# Altium PCB Acoustics Board.PcbDoc (part 2 of 3)
Units mil, origin at the board's own origin, x right, y up, seen from the top; angles counter-clockwise.
Board outline 4100 x 5000 mil, 4 copper layers (Top Layer, Middle 1 Layer, Middle 2 Layer, Bottom Layer), stack 53.912 mil thick; 240 components, 165 nets, 793 pads, 573 vias.
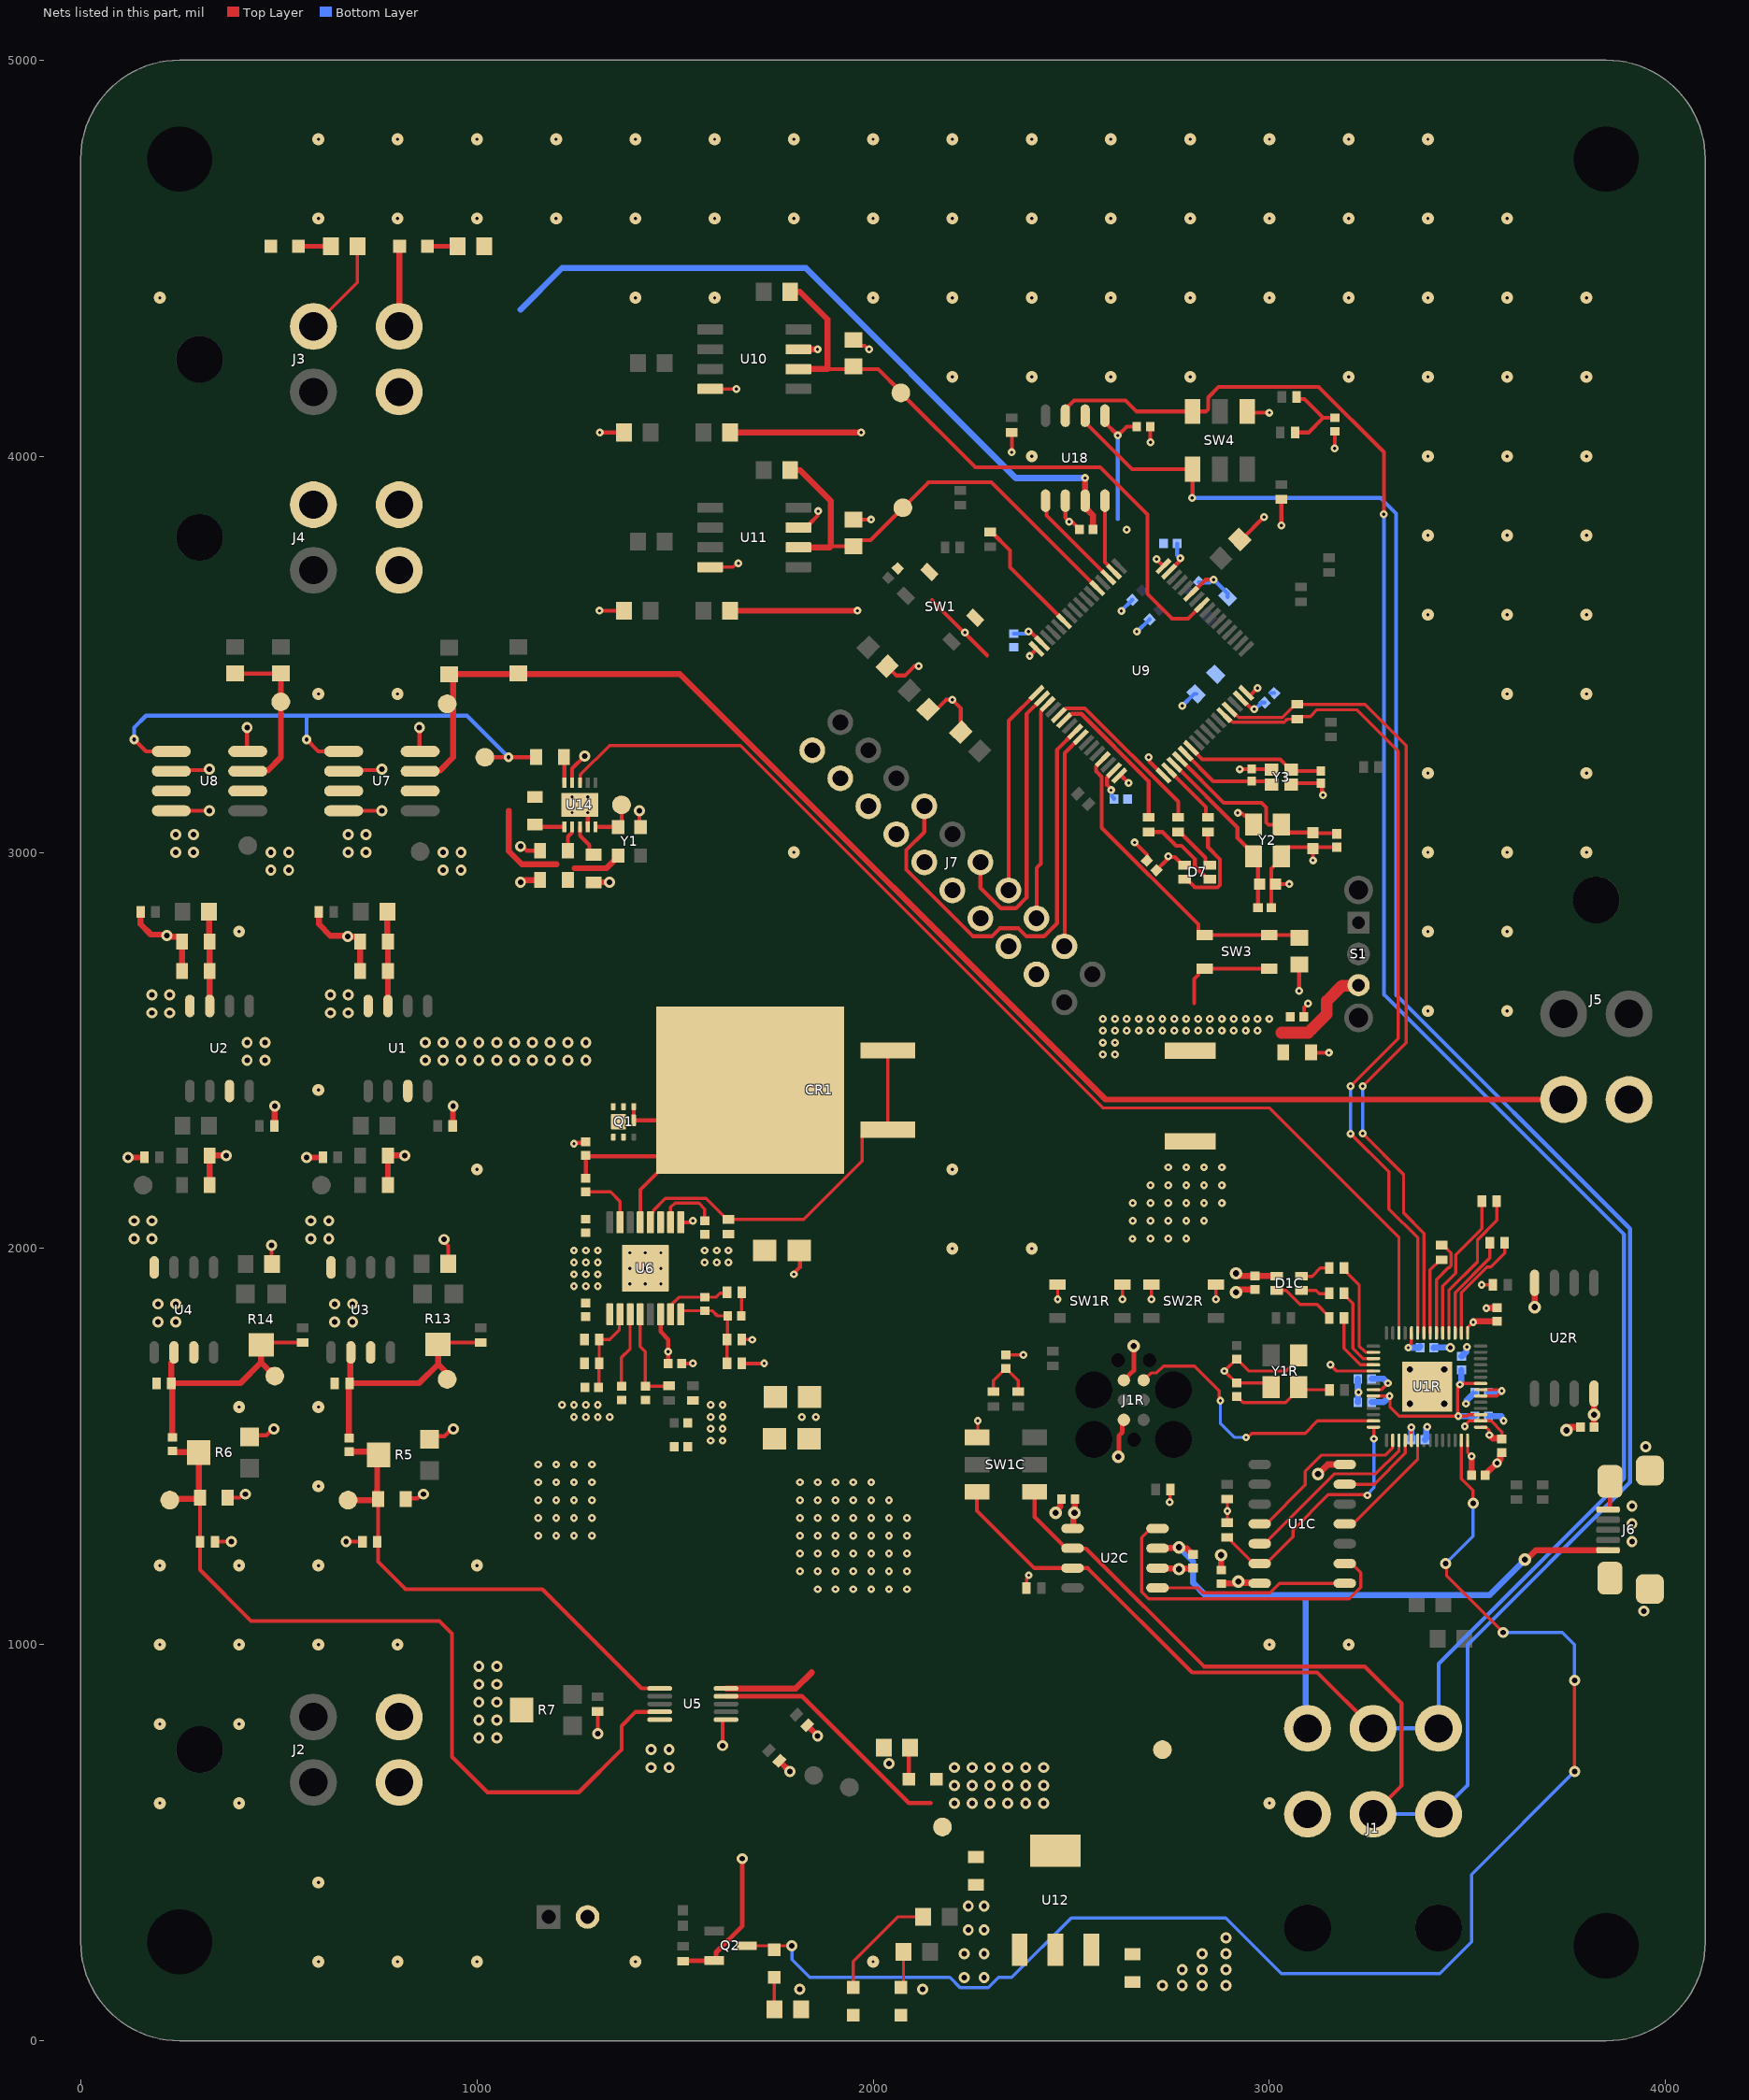
[diagram p4: the nets of this part, all layers, seen from the top]

## Part data (continued)
R17: library part RESISTOR_1K_0402, "RES 1k OHM 1% 1/16W 0402", Digikey Part Numer=CR0603-JW-104ELFTR-ND, Supplier Part Number 1=541-1.00MLCT-ND, Tolerance="+/- 1%", Value  (Ohms)=1M, Made By="Robert Pafford", Supplier=Digikey, Supplier 1=Digikey, Wattage=1/16W
R18: library part RESISTOR_1K_0402, "RES 1k OHM 1% 1/16W 0402", Digikey Part Numer=CR0603-JW-104ELFTR-ND, Supplier Part Number 1=P19181CT-ND, Tolerance="+/- 1%", Value  (Ohms)=10m, Made By="Robert Pafford", Supplier=Digikey, Supplier 1=Digikey, Wattage=1/16W
R19: library part RESISTOR_1K_0402, "RES 1k OHM 1% 1/16W 0402", Digikey Part Numer=CR0603-JW-104ELFTR-ND, Supplier Part Number 1=P5.23KLCT-ND, Tolerance="+/- 1%", Value  (Ohms)=5.23K, Made By="Robert Pafford", Supplier=Digikey, Supplier 1=Digikey, Wattage=1/16W
R21: library part RESISTOR_1K_0402, "RES 1k OHM 1% 1/16W 0402", Digikey Part Numer=CR0603-JW-104ELFTR-ND, Supplier Part Number 1=P21.5KLCT-ND, Tolerance="+/- 1%", Value  (Ohms)=21.5K, Made By="Robert Pafford", Supplier=Digikey, Supplier 1=Digikey, Wattage=1/16W
R22: library part RESISTOR_1K_0402, "RES 1k OHM 1% 1/16W 0402", Digikey Part Numer=CR0603-JW-104ELFTR-ND, Supplier Part Number 1=541-1.65KLCT-ND, Tolerance="+/- 1%", Value  (Ohms)=1.65K, Made By="Robert Pafford", Supplier=Digikey, Supplier 1=Digikey, Wattage=1/16W
R24 R25 R28 R29: library part RESISTOR_100K_0603, "RES 100k OHM 5% 1/10W 0603", Digikey Part Numer=CR0603-JW-104ELFTR-ND, Supplier Part Number 1=CR0603-JW-104ELFCT-ND, Tolerance="+/- 5%", Value  (Ohms)=100K, ComponentLink1Description=Datasheet, ComponentLink1URL=https://www.bourns.com/docs/product-datasheets/CRxxxxx.pdf, Made By="Flip B", Supplier=Digikey, Supplier 1=Digi-Key, Wattage=1/10W
R30: library part CMP-1018-00001-1, "Jumper 2512 (6432 Metric)", Case-EIA=2512, Case-Metric=6432, Power=None, Technology=SMT, Tolerance=None
R32: library part CMP-2002-00501-1, "RES SMD 27K OHM 5% 1/10W 0402ERJ-2GEJ273X", Manufacturer=Panasonic, Part Number=ERJ-2GEJ273X
R33 R34 R35 R36 R37 R50: library part RESISTOR_4.7K_0603, "RES 4.7k OHM 5% 1/10W 0603", Digikey Part Numer=CR0603-JW-104ELFTR-ND, Supplier Part Number 1=RMCF0603JT4K70CT-ND, Tolerance="+/- 5%", Value  (Ohms)=4.7K, Made By="Robert Pafford", Supplier=Digikey, Supplier 1=Digi-Key, Wattage=1/10W
R48 R49: library part RESISTOR_27_0603, "RES 27 OHM 5% 1/8W 0603", Digikey Part Numer=CR0603-JW-104ELFTR-ND, Supplier Part Number 1=2019-RK73B1JTTD270JCT-ND, Tolerance="+/- 5%", Value  (Ohms)=27, ComponentLink1Description=Datasheet, ComponentLink1URL=https://www.bourns.com/docs/product-datasheets/CRxxxxx.pdf, Made By="Robert Pafford", Supplier=Digikey, Supplier 1=Digi-Key, Wattage=1/8W
S1: "SWITCH SLIDE SPDT 300MA 30V", Supplier Part Number 1=CKN10397-ND, Supplier 1=Digikey
SB1 SB2 SB3 SB4 SB5 SB6 SB7: library part JUMPER_0_0603, "0 Ohm Jumper No Fit for Solder Bridge", Value  (Ohms)=0, ComponentLink1Description=Digikey, ComponentLink1URL=https://www.digikey.com/en/products/detail/koa-speer-electronics-inc/RK73B1JTTD101J/9844701, Made By="Robert Pafford"
SW1 SW3: library part "Tactile Switch SMD", "WS-TASV J-Bend SMT Tact Switch, SPST-NO, 16VDC, 50mA, 260g", Manufacturer="Wurth Elektronik", Operating Temperature Max=85°C, Operating Temperature Min=-40°C, Rated Current=50mA, Rated Voltage=16VDC, Supplier Part Number 1=710-434123025826, Category="Tact Switches", Circuit=SPST-NO, ComponentLink1Description="Website Link", ComponentLink1URL=https://www.we-online.com/redexpert/article/434123025826?ad, ComponentLink2Description="Datasheet Link", ComponentLink2URL=https://www.we-online.com/redexpert/spec/434123025826?ad, Contact Material="Stainless Steel", Contact Plating=Silver, Height=2.5mm, Length=4.2mm, Manufacturer Part Number=434123025826, Match Code=WS-TASV, Mount="Surface Mount", Operation Force=260g, Packaging="Tape and Reel", Supplier 1=Mouser, Terminal Material="Copper Alloy", Terminal Plating=Silver, Washable=No, Width=3.2mm
SW1C SW4: library part CAS-220TA_CAN_TERM, "GOLD SWITCH FLUSH SLIDE DPDT 100MA 6V", Current Rating="100 mA", Supplier Part Number 1=CAS220JCT-ND, Voltage Rating=6VDC, Contact Finish=Gold, Made By="Robert Pafford", Supplier 1=Digi-Key, Switch Function=DPDT
SW1R SW2R: library part "Tactile Switch SMD", "WS-TASV J-Bend SMT Tact Switch, SPST-NO, 16VDC, 50mA, 260g", Manufacturer="Wurth Elektronik", Operating Temperature Max=85°C, Operating Temperature Min=-40°C, Rated Current=50mA, Rated Voltage=16VDC, Category="Tact Switches", Circuit=SPST-NO, ComponentLink1Description="Website Link", ComponentLink1URL=https://www.we-online.com/redexpert/article/434123025826?ad, ComponentLink2Description="Datasheet Link", ComponentLink2URL=https://www.we-online.com/redexpert/spec/434123025826?ad, Contact Material="Stainless Steel", Contact Plating=Silver, Height=2.5mm, Length=4.2mm, Manufacturer Part Number=434123025826, Match Code=WS-TASV, Mount="Surface Mount", Operation Force=260g, Packaging="Tape and Reel", Terminal Material="Copper Alloy", Terminal Plating=Silver, Washable=No, Width=3.2mm
U1 U2 U3 U4: library part LM356MX/NOPB, "IC OPAMP JFET 1 CIRCUIT 8SOIC", Manufacturer="Texas Instruments", PartNumber=LM8261M5X/NOPB, Supply Current="1.3 mA", Supply Voltage="2.5 V ~ 30 V, +/- 1.25 V ~ 15 V", ComponentLink1Description=Digi-Key, ComponentLink1URL=https://www.digikey.com/en/products/detail/texas-instruments/LF356MX-NOPB/366701, Created By="Dylan T", Gain Bandwidth Product="21 MHz"
U1C: "CANbus Controller CAN 2.0 SPI Interface 14-SOIC", Made By="Robert Pafford", Max FD Rate="8 Mbps"
U1R: "Raspberry Pi RP2040", Crystal Frequency="12 MHz", Input Voltage=3.3V, Available Busses="SPI, I2C, PWM, USB", ComponentLink1Description=DigiKey, ComponentLink2Description=Datasheet, ComponentLink2URL=https://datasheets.raspberrypi.org/rp2040/rp2040-datasheet.pdf, Made By="Robert Pafford", Number of GPIOs=29
U2C U18: library part TJA1442AT, "CAN Interface IC High-Speed CAN Transceiver with Standby Mode", Supplier Part Number 1=771-TJA1442AT/0Z, Made By="Robert Pafford", Max Data Rate=5Mbps, Supplier 1=Mouser
U2R: "IC FLASH 128MBIT SPI/QUAD 8SOIC", Supplier Part Number 1=W25Q128JVSIQ-ND, Made By="Robert Pafford", Size=128M, Supplier 1=Digi-Key
U5: library part CMP-0360-00164-2, "4 ns, 150 MHz Comparator with Independent Input / Output Supplies, 2 Channels, 2.7 to 12 V, 0 to +70 degC, 10-pin MSOP (MS10)", Generic Part Number=LT1715, Manufacturer="Linear Technology", Supply Current (uA) Typical=7500, Supply Voltage Range="2.7 to 12 V", Channels (#)=2, ComponentLink1Description="Manufacturer URL", ComponentLink1URL=http://www.linear.com/, ComponentLink2Description=Datasheet, ComponentLink2URL=http://cds.linear.com/docs/en/datasheet/1715fa.pdf, ComponentLink3Description="Package Specification", ComponentLink3URL=http://cds.linear.com/docs/en/packaging/MSOP_10_05-08-1661.pdf, DatasheetVersion="Rev A", Features="Comparator, Separate In/Out Power Supply", Mounting Technology="Surface Mount", PackageDescription="10-Pin MSOP, Body 3 x 3 mm, Pitch 0.5 mm", PackageReference=MS10, PartNumber=LT1715CMS#PBF, Prop Delay (us)=0.004, RoHS=Y, Vos (mV) Guaranteed=2.5, Vos (mV) Typical=0.4, Vs Max (V)=12, Vs Min (V)=2.7
U6: library part CMP-0063-01290-3, "Wide Input Range Non-Synchronous Buck Controller, 16-pin TSSOP-EP, Pb-Free", Manufacturer="Texas Instruments", PackageTopMarking=NSUZXYTT*L25088*MH-1, PowerWise=Y, Code_JEDEC=MO-153-ABT, ComponentLink1Description="Datasheet URL", ComponentLink1URL=http://www.ti.com/general/docs/lit/getliterature.tsp?genericPartNumber=LM25088&fileType=pdf, CompType=MiscPower, PackageDescription="Molded TSSOP, Jedec, Exposed Pad, 5.0 x 4.4 x 0.9mm Body,16 Lead, 0.65mm Pitch", PackageReference=PWP0016A, PinCount=16, RoHS=Y
U7 U8: library part CMP-1592-00007-1, "Low Cost Analog Multiplier, 20 V/us, 6 mA, 0 to 70 degC, 8-Pin SOIC (R), RoHS, Tube", PartNumber=AD633, Supply Current Max="6 mA", Temperature Max="70 degC", Temperature Min="0 degC", Code_JEDEC=MS-012-AA, ComponentLink1Description="Manufacturer URL", ComponentLink1URL=http://www.analog.com/en/index.html, ComponentLink2Description=Datasheet, ComponentLink2URL=http://www.analog.com/media/en/technical-documentation/data-sheets/AD633.pdf, ComponentLink3Description="Package Specification", ComponentLink3URL=http://www.analog.com/media/en/package-pcb-resources/package/pkg_pdf/soic_narrow-r/r_8.pdf, DatasheetVersion="Rev. K", Mounting Technology="Surface Mount", Number of Channels=2, PackageDescription="8-Pin Small Outline Package, Body 4.9 x 3.9 mm, Pitch 1.27 mm", PackageVersion=06/2006, Packing=Tube, RoHS=TRUE, Slew Rate="20 V/us"
U9: "No Description Available", Mfr_Name=STMicroelectronics, RefDes=RefDes, Type=Type
U10 U11: library part CMP-0272-00518-3, "High Precision, Low Noise Operational Amplifier, 5 to 36 V, -55 to 125 degC, 8-pin SOIC (D8), Green (RoHS & no Sb/Br)", Manufacturer="Texas Instruments", Rating=Catalog, Total Supply Voltage(Max)(+5V is 5, +/-5V is 10)=36, Total Supply Voltage(Min)(+5V is 5, +/-5V is 10)=5, CMRR(Min)(dB)=120, Code_JEDEC=MS-012, ComponentLink1Description="Manufacturer URL", ComponentLink1URL=http://www.ti.com/, ComponentLink2Description=Datasheet, ComponentLink2URL=http://www.ti.com/lit/ds/symlink/opa228.pdf, ComponentLink3Description="Package Specification", ComponentLink3URL=http://www.ti.com/litv/pdf/msoi002j, DatasheetVersion=SBOS110A, Eco-Plan="Green (RoHS & no Sb/Br)", GBW(Typ)(MHz)=33, IIB(Max)(pA)=10000, Iq per channel(Max)(mA)=3.8, Mounting Technology="Surface Mount", Number of Channels=1, Offset Drift(Typ)(uV/C)=0.1, PackageDescription="8-Pin Plastic Small Outline, Body 4.9 x 3.9 mm, Pitch 1.27 mm", PackageReference=D0008A, PackageVersion="4040047-3/M, 06/2011", Packing=TUBE, PartNumber=OPA228U, Slew Rate(Typ)(V/us)=11, Sub Family="High Supply Voltage Amplifier (>=30V), Low Noise Amp (<=10nV/rtHz), Low Offset Voltage Amplifier (<=500uV), Precision Amplifier", Vio (25C)(Max)(mV)=0.075
U12: "800-mA 15-V linear voltage regulator 4-SOT-223 -40 to 125", Package="SOT-223-4 Texas Instruments", Arrow_Electronics-Purchase-URL=https://snapeda.com/shop?store=Arrow+Electronics&id=410186, Availability=Good, DigiKey-Purchase-URL=https://snapeda.com/shop?store=DigiKey&id=410186, MF="Texas Instruments", Mouser-Purchase-URL=https://snapeda.com/shop?store=Mouser&id=410186, MP=LM1117IMPX-3.3/NOPB, Price=None, SnapEDA_Link=https://www.snapeda.com/parts/LM1117IMPX-3.3/NOPB/Texas%20Instruments/view-part/410186/?ref=snap, Texas_Instruments-Purchase-URL=https://snapeda.com/shop?store=Texas+Instruments&id=410186
U14: library part AD9837ACPZ, "Direct Digital Synthesis IC 10 b 5 MHz 28 b Tuning 10-LFCSP-WD (3x3)"
Y1: library part CMP-40224-000034-1, "XTAL OSC TCXO 25.0000MHZ HCMOS", RoHS Compliant=Yes
Y1R: library part CRYSTAL_12MHz_SMD_SMALL, "12 MHz ±20ppm Crystal 18pF 100 Ohms 4-SMD, No Lead (3.2x2.5mm)", Frequency="12 MHz", Load Capacitance=18pF, Supplier Part Number 1=2151-RH100-12.000-18-2030-EXT-TRCT-ND, ESR="100 Ohms", Made By="Robert Pafford", Supplier 1=Digi-Key
Y2: library part CRYSTAL_32.786kHz_SMD_SMALL, "32.768 kHz XO (Standard) CMOS Oscillator 1.62V ~ 3.63V Enable/Disable 4-SMD, No Lead", Capacitance="15 pF"
Y3: library part CMP-27762-000556-1, "Crystal 24MHz ±10ppm 7pF SMD-4 2mm x 1.6mm", RoHS Compliant=Yes

## Free pads (board coordinates)
  round 0 hole 165 unplated: 1(250,250) 1(250,4750) 1(3850,240) 1(3850,4750)

## Via types
v1: diameter 19.68, hole 7.87, Top Layer to Bottom Layer, tented both sides, 176 vias
v2: diameter 28, hole 14, Top Layer to Bottom Layer, tented both sides, 168 vias
v3: diameter 30, hole 8, Top Layer to Bottom Layer, tented both sides, 106 vias
v4: diameter 20, hole 7.87, Top Layer to Bottom Layer, tented both sides, 99 vias
v5: diameter 31.5, hole 15.75, Top Layer to Bottom Layer, tented both sides, 19 vias
v6: diameter 24, hole 10, Top Layer to Bottom Layer, tented both sides, 3 vias
v7: diameter 23.62, hole 11.81, Top Layer to Bottom Layer, tented both sides, 2 vias

## Nets (pads, with @x,y where several pads share a name; then routed paths per layer and width w, separated by ;. In a path a pad name is that pad's centre, name@x,y a point inside that pad or via, vN(x,y) a via of type N, cw(c..) or ccw(c..) an arc to the next point about the centre after c; other vN are vias at no path point)
1v1_RP2040: C11R.1 C12R.1 C13R.1 U1R.23 U1R.45 U1R.50 | length 579.4
  Top Layer w7.87: U1R.23@3262.5,1627.83 v1(3303.35,1627.83) 3304.49,1626.69 3304.49,1599.14 3326.97,1576.65 v1(3476.57,1576.65) ; U1R.45@3533.17,1580.59 3502.17,1580.59 3498.23,1576.65 v1(3476.57,1576.65) ; U1R.50@3533.17,1659.33 3486.4,1659.33 3483.71,1656.64 v1(3480.51,1656.64) 3480.51,1653.44 3474.61,1647.53 3474.61,1578.62 v1(3476.57,1576.65)
  Bottom Layer w15.75: C12R.1@3257.48,1612.09 3287.6,1612.09 v1(3303.35,1627.83) ; v1(3476.57,1576.65) C11R.1@3518.5,1576.65 ; v1(3480.51,1656.64) 3480.51,1657.7 3484.45,1661.64 C13R.1@3484.45,1693.39
3V3: C1C.1 C3C.1 C3R.1 C4R.1 C5C.1 C5R.1 C6R.1 C7R.1 C8R.1 C9R.1 C10R.1 C29.2 C31.1 C32.1 C37.1 D1C.4 D8.1 J1R.2 Q2.2 R1C.1 R4C.1 R4R.1 R5R.1 R7.2 R30.1 R31.1 TP19.TP U1C.14 U1R.1 U1R.10 U1R.22 U1R.33 U1R.42 U1R.43 U1R.44 U1R.48 U1R.49 U2C.5 U2R.8 U5.9 U12.2 U12.4 U14.2 Y1.4 | length 2769.7
  Top Layer w7.87: v1(2748.23,1360.12) 2749.21,1361.1 2749.21,1390.63 R4R.1@2750.2,1391.61 ; C1C.1@2878.15,1154.02 C1C.1@2878.64,1154.51 ; R4C.1@2893.9,1307.95 v1(2893.9,1337.78) R1C.1@2893.9,1367.6 ; v1(3350.59,1749.88) 3350.59,1753.08 3358.46,1760.95 U1R.10@3358.46,1786.79 ; U1R.33@3358.46,1516.12 v1(3358.46,1549.09) ; v1(3493.05,1551.06) 3493.05,1553.76 3504.13,1564.84 U1R.44@3533.17,1564.84 3559.25,1564.84 3586.81,1537.28 C4R.1@3586.81,1518.98 ; U1R.42@3500.2,1516.12 3500.2,1486.1 v1(3510.63,1475.67) ; U1R.1@3500.2,1786.79 3500.2,1800.08 v1(3514.23,1814.12) ; U1R.43@3533.17,1549.09 3546.46,1549.09 3553.81,1541.74 v1@3553.81,1530.92 ; U1R.48@3533.17,1627.83 3573.76,1627.83 v1(3586.51,1640.59) 3586.81,1640.89 3583.02,1640.89 3580.32,1643.58 U1R.49@3533.17,1643.58 ; v1(3535.63,1908.6) R5R.1@3564.17,1908.6
  Top Layer w8: U1R.22@3262.5,1643.58 3262.56,1643.65 3282.97,1643.65 v1(3299.41,1660.09)
  Top Layer w9.84: D1C.4@3017.94,1931.01 D1C.4@3018.23,1931.3
  Top Layer w10: C31.1@1229.68,3004.29 1229.68,3039.48 1240.31,3050.11 U14.2@1240.31,3064.29
  Top Layer w11: U5.9@1628.66,870 1820,870 2090,600 2145,600
  Top Layer w11.81: v5(2618.31,1474.29) 2620.08,1476.07 2620.08,1527.25 2629.01,1536.17 2629.01,1563.93 J1R.2@2632.68,1567.6
  Top Layer w12: R31.1@1520,201.3 1520.6,201.9 1598.4,201.9 1603.56,207.06 1603.56,223.56 1670,290 v2(1670,460)
  Top Layer w15: 1080,3105 1080,3003.46 1113.46,2970 1201.16,2970 ; C29.2@1229.49,2930.09 C29.2@1230,2930.59 ; 1246.99,2960.09 1326.95,2960.09 1356.25,2989.39 Y1.4@1356.25,2991.36
  Top Layer w15.75: U2C.5@2503.15,1293.39 2505.61,1295.85 2505.61,1330.1 v5(2508.07,1332.56) 2508.76,1333.25 2508.76,1367.3 C3C.1@2509.45,1367.99 ; C1C.1@2878.64,1154.51 2912.37,1154.51 2917.2,1159.33 v5(2921.46,1159.33) 2924.28,1156.51 2973.1,1156.51 U1C.14@2975.1,1154.51 ; v5(2915.87,1937.21) 2920.13,1937.21 2926.63,1930.71 C5C.1@2963.11,1930.71 ; C5C.1@2965.52,1931.01 D1C.4@3017.94,1931.01 ; C10R.1@3510.63,1428.29 v1(3510.63,1475.67) ; v1(3514.23,1814.12) 3515.3,1814.12 3517.86,1816.67 C7R.1@3575,1816.67 ; v1(3555.31,1529.41) 3563.91,1520.82 3584.97,1520.82 C4R.1@3586.81,1518.98 ; C3R.1@3819.29,1549.09 U2R.8@3819.29,1633.8
  Bottom Layer w15.75: C8R.1@3257.48,1671.25 3288.37,1671.25 3299.41,1660.2 v1(3299.41,1660.09) ; v1(3350.59,1749.88) 3377.56,1749.88 3380.71,1753.03 C6R.1@3380.71,1753.82 ; C9R.1@3358.46,1517.6 v1(3358.46,1549.09) ; C5R.1@3552.76,1636.95 3581.81,1636.95 3585.45,1640.59 v1(3586.51,1640.59)
  other v1: 2654.42,2024.63 2700,2025 2745,2025 2790,2025 2655,2070 2700,2070 2745,2070 2790,2070 2835,2070 2655,2115 2700,2115 2745,2115 2790,2115 2835,2115 2880,2115 2700,2160 2745,2160 2790,2160 2835,2160 2880,2160 2745,2205 2790,2205 2835,2205 2880,2205
  other v2: 2205,600 2250,600 2295,600 2340,600 2385,600 2430,600 2205,645 2250,645 2295,645 2340,645 2385,645 2430,645 2205,690 2250,690 2295,690 2340,690 2385,690 2430,690 1005,765 1050,765 1005,810 1050,810 1005,855 1050,855 1005,900 1050,900 1005,945 1050,945
  other v5: 3819.09,1580.59
3V3_STM32: C34.1 C35.1 C38.1 C39.1 C40.1 C41.1 C43.1 C44.1 C71.1 D7.4 R24.2 R28.2 R30.2 R42.1 S1.3 SB1.2 SW3.B1 SW3.B2 U9.1 U9.16 U9.32 U9.48 U9.64 U10.7 U11.7 U18.5 | length 2081.8
  Top Layer w10: U11.7@1811.22,3820 1830.91,3820 1838.7,3827.8 1838.7,3828.7 1859.66,3849.66 1859.66,3859.36 v4(1861.57,3861.27) ; v4@2395,3495 v4(2395,3495.61) 2395,3496.23 U9.48@2412.56,3513.79 ; U18.5@2585,4102.28 2585,4085.09 2617.32,4052.78 v4(2617.32,4052.32) 2640,4075 C41.1@2665,4075 ; U9.64@2621.36,3193.64 2623.15,3195.44 2624.56,3195.44 v4(2645,3175) ; v4(2695,3240) 2696.91,3238.09 2696.91,3229.44 U9.1@2732.71,3193.64 ; C71.1@2715,2955 2743.09,2983.09 2743.09,2988.09 v4(2745,2990) 2746.91,2988.09 2761.15,2988.09 2781.52,2967.72 D7.4@2786.44,2967.72 ; v4(2715,3740) 2732.42,3722.58 U9.32@2732.71,3722.58 ; 2810,2620 2810,2680.37 2820.64,2691.01 2820.64,2698.88 2828.43,2706.68 SW3.B1@2836.31,2706.68 SW3.B2@2999.69,2706.68 ; SB1.2@2916,3792 2932,3792 v4(2986.31,3846.31) ; U9.16@2941.5,3402.44 2948.76,3395.18 2950.18,3395.18 v4(2970,3415) ; v4(3030,3825) R42.1@3030,3891.3
  Top Layer w15: R28.2@1638.5,3610 v4(1960,3610) ; R24.2@1638.5,4060 v4(1970,4060)
  Top Layer w15.75: U10.7@1820,4270 v4(1859.63,4270)
  Top Layer w30: 3030,2545 3098.24,2545 3106.43,2553.19 3144.91,2591.66 3144.91,2624.91 3183.38,2663.38 3223.38,2663.38 S1.3@3225,2665
  Bottom Layer w10: 2617.32,3840.96 v4(2617.32,4052.32) ; v4(2970,3415) v4@2971.91,3413.09 ; C35.1@3003.59,3402.11 C35.1@3012.11,3402.11
  other v4: 2580,2490 2610,2490 2580,2520 2610,2520 2580,2550 2610,2550 2640,2550 2670,2550 2700,2550 2730,2550 2760,2550 2790,2550 2820,2550 2850,2550 2880,2550 2910,2550 2940,2550 2970,2550 2580,2580 2610,2580 2640,2580 2670,2580 2700,2580 2730,2580 2760,2580 2790,2580 2820,2580 2850,2580 2880,2580 2910,2580 2940,2580 2970,2580 3000,2580
5V: C4C.1 C7.1 C8.1 C9.1 C36.1 C42.1 D6.1 J1.4 J3.4 J4.4 J6.1 Q1.1 Q1.2 Q1.5 Q1.6 Q1.8 R15.1 TP11.TP U1.7 U2.7 U2C.3 U3.7 U4.7 U5.10 U6.1 U7.6 U8.6 U12.3 U18.3 | length 3890.3
  Top Layer w15.75: J3.4@803.94,4327.68 804.47,4328.21 804.47,4529.47 D6.1@805,4530 ; U5.10@1628.66,889.68 1804.68,889.68 1845,930 ; v4(2535,3945) U18.3@2535,3887.72 2535,3870.43 2555,3850.43 C42.1@2555,3815 ; U2C.3@2717.72,1243.39 2719,1244.67 2770.57,1244.67 v5(2771.85,1245.94) ; 2791.2,1242.93 2803.35,1230.79 2804.13,1230.79 C4C.1@2807.28,1227.64 ; v5(3645,1215) 3649.26,1215 3673.08,1238.82 J6.1@3854.69,1238.82
  Bottom Layer w15.75: 1110,4370 1215,4475 1830,4475 2360,3945 v4(2535,3945) ; v5(2771.85,1245.94) 2807.28,1210.51 2807.28,1156.16 2838.45,1125 3090,1125 ; J1.4@3096.25,788.94 3091.83,793.36 3091.83,1123.17 3090,1125 ; v5(3645,1215) 3555,1125 3090,1125
  other v1: 1860,1140 1905,1140 1950,1140 1995,1140 2040,1140 2085,1140 1815,1185 1860,1185 1905,1185 1950,1185 1995,1185 2040,1185 2085,1185 1815,1230 1860,1230 1905,1230 1950,1230 1995,1230 2040,1230 2085,1230 1155,1275 1200,1275 1245,1275 1290,1275 1815,1275 1860,1275 1905,1275 1950,1275 1995,1275 2040,1275 2085,1275 1155,1320 1200,1320 1245,1320 1290,1320 1815,1320 1860,1320 1905,1320 1950,1320 1995,1320 2040,1320 2085,1320 1155,1365 1200,1365 1245,1365 1290,1365 1815,1365 1860,1365 1905,1365 1950,1365 1995,1365 2040,1365 1155,1410 1200,1410 1245,1410 1290,1410 1815,1410 1860,1410 1905,1410 1950,1410 1995,1410 1155,1455 1200,1455 1245,1455 1290,1455
  other v2: 195,1815 240,1815 641.31,1815 686.31,1815 195,1860 240,1860 641.31,1860 686.31,1860 420,2475 465,2475 870,2475 915,2475 960,2475 1005,2475 1050,2475 1095,2475 1140,2475 1185,2475 1230,2475 1275,2475 420,2520 465,2520 870,2520 915,2520 960,2520 1005,2520 1050,2520 1095,2520 1140,2520 1185,2520 1230,2520 1275,2520 480,2955 525,2955 915,2955 960,2955 480,3000 525,3000 915,3000 960,3000
-5V: C9.2 C12.2 C13.2 C14.2 C15.2 C16.2 C18.2 C19.2 C20.2 C21.2 J3.2 J4.2 R16.2 R18.2 R20.1 R22.2 R50.2 U1.4 U2.4 U3.4 U4.4 U5.5 U6.6 U6.11 U7.3 U8.3 | length 406.6
  Top Layer w8: J3.2@587.4,4327.68 698.5,4438.78 R50.2@698.5,4530 ; R22.2@1668.7,1770 v1(1695,1770)
  Top Layer w11: U6.6@1463.39,1833.86 1463.39,1790.28 1482.87,1770.79 C19.2@1482.87,1710
  other v1: 1590,1515 1620,1515 1590,1545 1620,1545 1245,1575 1275,1575 1305,1575 1335,1575 1590,1575 1620,1575 1215,1605 1245,1605 1275,1605 1305,1605 1590,1605 1620,1605 1482.87,1740 1575,1965 1605,1965 1635,1965 1575,1995 1605,1995 1635,1995
  other v2: 1440,690 1485,690 1440,735 1485,735 135,2025 180,2025 581.31,2025 626.31,2025 135,2070 180,2070 581.31,2070 626.31,2070 180,2595 225,2595 630,2595 675,2595 180,2640 225,2640 630,2640 675,2640 240,3000 285,3000 675,3000 720,3000 240,3045 285,3045 675,3045 720,3045
ADC4_IN5: "ADC L.TP" R27.1 R49.1 U9.37 U11.6 | length 1188.3
  Top Layer w10: 1891.05,3770 1893,3771.95 1894.05,3773 R49.1@1950,3773 1965,3788 1993.38,3788 2139.91,3934.53 2298.05,3934.53 U9.37@2565.68,3666.9
  Top Layer w15: R27.1@1785.54,3965 R27.1@1790.5,3965 1815,3965 1893,3887 1893,3771.95 ; U11.6@1811.22,3770 1891.05,3770
"ADC R": "ADC R.TP" R23.1 R48.1 U9.25 U10.6 | length 1731.8
  Top Layer w10: U10.6@1824.02,4220 1885,4220 2012.58,4220 2070,4162.58 2070,4160 2257.87,3972.13 2572.87,3972.13 2692.13,3852.87 2692.13,3652.3 2754.43,3590 2795,3590 U9.25@2830.15,3625.15
  Top Layer w15: R23.1@1785.54,4415 1815,4415 1885,4345 1885,4220 U10.6@1807.28,4220
AUX_L: DNP11.1 U1R.9 U9.12 | length 2091.3
  Top Layer w8: U9.12@2885.82,3346.76 2888.65,3346.76 2906.95,3328.46 3037.14,3328.46 3044.99,3336.3 DNP11.1@3070,3336.3 3076.83,3343.13 3103.13,3343.13 3120,3360 3220,3360 3325,3255 3325,2530 v4(3205,2410) ; v4(3205,2290) 3301.3,2193.7 3301.3,2100 3374.21,2027.09 U1R.9@3374.21,1786.79
  Bottom Layer w8: v4(3205,2290) v4(3205,2410)
AUX_R: DNP11.2 U1R.8 U9.13 | length 2103.3
  Top Layer w8: U9.13@2899.74,3360.68 2902.57,3360.68 2923.25,3340 3032.36,3340 3066.06,3373.7 3241.3,3373.7 3345,3270 3345,2519.07 v4(3235.47,2409.53) ; v4(3235.47,2290.47) 3338.7,2187.23 3338.7,2090 3389.96,2038.74 U1R.8@3389.96,1786.79
  Bottom Layer w8: v4(3235.47,2290.47) v4(3235.47,2409.53)
Boot: R11.1 SW3.A1 SW3.A2 U9.61 | length 811.6
  Top Layer w10: U9.61@2579.6,3235.4 2579.6,3233.99 2562.66,3217.05 2562.66,3204.97 2576.95,3190.67 2576.95,3062.2 2820.64,2818.52 2820.64,2799.12 2828.43,2791.32 SW3.A2@2999.69,2791.32 3069.18,2791.32 R11.1@3076,2784.5
CANCLK_RP2CAN: U1C.6 U1R.32 | length 217.8
  Top Layer w7.87: U1C.6@3190.16,1405 3264.45,1405 3342.72,1483.27 U1R.32@3342.72,1516.12
CANH_RP2CAN: J1.5 J1.6 SW1C.4 SW4.4 U2C.7 U18.7 | length 6058.8
  Top Layer w10: SW1C.4@2262.01,1385.71 2262.01,1337.99 2406.61,1193.39 2541.61,1193.39 2805,930 3120.55,930 J1.5@3261.61,788.94 ; U18.7@2485,4102.28 2485,4119.02 2506.81,4140.83 2636.96,4140.83 2664.95,4112.83 SW4.4@2806.1,4112.83 2839.46,4112.83 2845.32,4118.69 2845.32,4148.47 2871.61,4174.76 3124.34,4174.76 3288.83,4010.28 v4(3288.83,3853.83)
  Bottom Layer w10: J1.5@3261.61,788.94 J1.6@3426.96,788.94 3426.96,951.96 3895,1420 3895,2035 3288.83,2641.17 v4(3288.83,3853.83)
CANL_RP2CAN: J1.2 J1.3 SW1C.1 SW4.1 U2C.6 U18.6 | length 6330.2
  Top Layer w10: SW1C.1@2407.68,1385.71 2407.68,1322.13 2486.42,1243.39 U2C.6@2503.15,1243.39 2503.74,1242.79 2537.21,1242.79 2835,945 3240,945 3333.54,851.46 3333.54,644.33 J1.2@3261.61,572.4 ; U18.6@2535,4102.28 2535,4085.55 2653.39,3967.17 SW4.1@2806.1,3967.17 v4@2806.1,3891.1
  Bottom Layer w10: v4(2805,3895) 3280,3895 3320,3855 3320,2640 3910,2050 3910,1410 3500,1000 3500,645.44 J1.3@3426.96,572.4 J1.2@3261.61,572.4
CANRX_RP2CAN: U1C.2 U2C.4 | length 845.6
  Top Layer w7.87: U2C.4@2717.72,1293.39 2700.98,1293.39 2677.36,1269.76 2677.36,1133.6 2695.53,1115.43 3200.73,1115.43 3230.51,1145.22 3230.51,1181.38 3206.89,1205 U1C.2@3190.16,1205
CANRX_STM: U9.34 U18.4 | length 188.3
  Top Layer w10: U18.4@2585,3887.72 2585,3732.51 2607.44,3710.08 U9.34@2607.44,3708.66
CANTX_RP2CAN: U1C.1 U2C.1 | length 487.4
  Top Layer w7.87: U2C.1@2717.72,1143.39 2820.06,1143.39 2832.26,1131.18 3001.91,1131.18 3025.73,1155 U1C.1@3190.16,1155
CANTX_STM: U9.35 U18.1 | length 258.6
  Top Layer w10: U18.1@2435,3887.72 2437.61,3885.11 2437.61,3850.65 U9.35@2593.52,3694.74
"Comparator L": C5.1 D1.2 DNP3.2 R5.2 TP2.TP U5.1 | length 1267.4
  Top Layer w10: C5.1@747.48,1365 C5.1@750.54,1368.07 750.54,1209.46 820,1140 1165.31,1140 1415.28,890.03 1460.99,890.03 U5.1@1461.34,889.68
  Top Layer w15: TP2.TP@675,1365 C5.1@747.48,1365 ; D1.2@677.31,1486.96 718.66,1486.96 718.7,1487 748.23,1487 748.23,1389.84 747.76,1389.38 C5.1@747.76,1369.38
"Comparator R": C6.1 D2.2 DNP17.2 R6.2 TP3.TP U5.4 | length 2134.6
  Top Layer w10: C6.1@301.08,1371.25 301.08,1188.92 430,1060 905,1060 937.1,1027.9 937.1,717.11 1026.9,627.31 1257.31,627.31 1365,735 1365,795 1400.56,830.56 U5.4@1461.34,830.63 U5.4@1461.34,830.63
  Top Layer w15: TP3.TP@225,1365 228.13,1368.13 297.95,1368.13 C6.1@301.08,1371.25 ; D2.2@231.55,1489.23 234.38,1486.4 296.83,1486.4 R6.2@298.23,1485 C6.1@298.23,1374.1
DBG_TX_RP2040: J1R.5 U1R.27 | length 732.1
  Top Layer w7.87: J1R.5@2682.68,1667.6 2684.17,1667.6 2702.74,1686.16 2715.77,1686.16 2732.64,1703.04 2810.82,1703.04 2873.03,1640.82 2873.03,1618.8 v1(2876.18,1615.65) ; v1(2941.14,1523.5) 2945.75,1523.5 2955.6,1533.35 3090.01,1533.35 3121.51,1564.84 U1R.27@3262.5,1564.84
  Bottom Layer w7.87: v1(2876.18,1615.65) 2876.18,1558.94 2911.61,1523.5 v1(2941.14,1523.5)
"Envelope Detector L": D1.1 DNP16.1 DNP22.1 R13.2 TP7.TP U3.6 | length 655.2
  Top Layer w9.84: R13.2@901.94,1757.91 906.62,1762.6 DNP16.1@1010,1762.6
  Top Layer w15: D1.1@677.31,1521.21 677.31,1658.61 DNP22.1@678.7,1660 ; U3.6@681.94,1737.72 680.32,1736.1 680.32,1661.62 DNP22.1@678.7,1660 ; R13.2@901.94,1757.91 901.94,1708 ; TP7.TP@925.77,1684.17 901.94,1708 ; DNP22.1@678.7,1660 853.94,1660 901.94,1708
"Envelope Detector R": D2.1 DNP18.1 DNP26.1 R14.2 TP8.TP U4.6 | length 666.9
  Top Layer w9.84: R14.2@455.63,1757.28 460.94,1762.6 DNP18.1@560,1762.6
  Top Layer w15: D2.1@231.55,1523.48 231.55,1657.15 DNP26.1@228.7,1660 ; U4.6@235.63,1737.72 235.63,1718.65 228.7,1711.72 DNP26.1@228.7,1660 ; R14.2@455.63,1757.28 455.63,1712.28 ; TP8.TP@489.91,1678 455.63,1712.28 ; DNP26.1@228.7,1660 403.35,1660 455.63,1712.28
FSYNC: U1R.12 U14.8 | length 2873
  Top Layer w7.87: U14.8@1260,3175.71 1260.98,3176.69 1260.98,3195.98 1335,3270 1665,3270 2580,2355 3000,2355
  Top Layer w8: 3000,2355 3326.97,2028.03 U1R.12@3326.97,1786.79
GND: C1.2 C1C.2 C1R.2 C2.2 C2C.1 C2R.2 C3.2 C3C.2 C3R.2 C4.2 C4C.2 C4R.2 C5.2 C5C.2 C5R.2 C6.2 C6R.2 C7.2 C7R.2 C8.2 C8R.2 C9R.2 C10R.2 C11R.2 C12R.2 C13R.2 C18.1 C19.1 C20.1 C21.1 C22.2 C25.2 C26.2 C27.2 C28.2 C29.1 C30.1 C31.2 C34.2 C35.2 C36.2 C37.2 C38.2 C39.2 C40.2 C41.2 C42.2 C43.2 C44.2 C65.2 C66.1 C67.2 C68.1 C69.1 C70.1 C71.2 C72.1 D4.2 D5.2 D9.1 DNP3.1 DNP17.1 DNP19.2 DNP20.2 DNP21.2 DNP22.2 DNP23.2 DNP24.2 DNP25.2 DNP26.2 DNP27.2 DNP28.2 J1.1 J1R.6 J2.3 J2.4 J3.3 J4.3 J5.4 J6.5 J6.6 J6.7 J6.8 J6.9 J7.4 J7.6 J7.8 J7.10 J7.12 J7.14 J7.16 J7.18 J7.20 J8.2 L1.2 L2.2 L3.2 L4.2 L5.1 R5.3 R6.3 R6C.2 R8.2 R9.2 R10.2 R11.2 R19.1 R25.2 R29.2 R33.2 R36.2 R37.2 R38.1 R39.1 R40.1 R41.2 R48.2 R49.2 SW1.B1 SW1.B2 SW1C.6 SW1R.B1 SW1R.B2 SW2R.B1 SW2R.B2 SW4.6 U1C.7 U1R.19 U1R.57 U2C.2 U2R.4 U5.6 U6.9 U6.17 U7.2 U7.4 U7.8 U8.2 U8.4 U8.8 U9.15 U9.27 U9.31 U9.47 U9.63 U10.4 U11.4 U12.1 U14.4 U14.9 U14.11 U18.2 Y1.2 Y1R.2 Y1R.4 Y2.1 Y2.3 Y3.2 Y3.4 | length 6780.2
  Top Layer w7.87: SW1C.6@2262.01,1523.5 2263.98,1525.47 v1(2263.98,1564.84) ; C2C.1@2334.84,1731.57 v1(2379.44,1731.57) ; R6C.2@2387.01,1143.39 2387.01,1166.76 2392.57,1172.33 v1(2392.57,1175.53) ; v1(2465.75,1871.93) SW1R.B2@2465.75,1909.33 ; v1(2629.13,1871.93) 2629.13,1905.47 SW1R.B1@2629.25,1905.59 ; v1(2701.97,1871.93) SW2R.B2@2701.97,1909.33 ; v1(2865.35,1871.93) SW2R.B1@2865.35,1909.33 ; v1(3153.74,1706.57) 3169.49,1690.83 U1R.19@3262.5,1690.83 ; U1R.57@3350.59,1690.83 v5(3354.53,1694.76)
  Top Layer w8: U11.4@1592.72,3720 1646.75,3720 1656.75,3730 v4(1660,3730) ; U10.4@1592.72,4170 v4(1655,4170) ; SW1R.B1@2626.57,1908.27 SW1R.B1@2629.25,1905.59 ; v1(2886.02,1690.83) v1@2886.61,1690.83 ; Y1R.2@3004.13,1650.2 2993.62,1660.71 C2R.2@2917.52,1660.71 2916.73,1660.71 v1@2886.61,1690.83 ; Y1R.4@3074.13,1730.2 3074.13,1724.29 3040.61,1690.76 2948.49,1690.76 2918.31,1720.94 C1R.2@2917.52,1720.94 2916.73,1720.94 v1@2886.61,1690.83
  Top Layer w9.84: DNP17.1@338.7,1260 v2(380,1260) ; v2(670,1260) DNP3.1@711.3,1260 ; v1(1245,2265) 1246.88,2266.88 1272.63,2266.88 L5.1@1275,2269.25 ; J6.5@3854.69,1341.18 3856.65,1341.18 3859.61,1344.13 3859.61,1407.95 J6.7@3857.56,1410
  Top Layer w10: U8.4@228.86,3105 v2(325.31,3105) ; U8.2@228.86,3205 231.36,3207.5 322.81,3207.5 v2(325.31,3210) ; C6.2@371.7,1371.02 401.46,1371.02 410.44,1380 v2(415.31,1380) ; v2(420,3315) 420,3256.77 U8.8@421.77,3255 ; R6.3@429.87,1528.65 469.1,1528.65 485.44,1545 v2@490.31,1545 ; v2(481.94,2008) 481.94,1961.98 R10.2@483.29,1960.63 ; U7.4@663.86,3105 v2(760.31,3105) ; U7.2@666.36,3207.5 v2@757.81,3207.5 ; C5.2@820.54,1369.38 849.82,1369.38 860.44,1380 v2(865.31,1380) ; v2(855,3315) 855,3256.77 U7.8@856.77,3255 ; R5.3@880.31,1518.74 887.94,1526.37 917.93,1526.37 936.56,1545 v2(940.31,1545) ; v2(916.94,2023) 916.94,2018.13 927.96,2007.1 R9.2@927.96,1961.49 ; v2(1110,3015) 1114.87,3015 1125.58,3004.29 C31.2@1159.68,3004.29 ; U14.9@1240.31,3175.71 1240.31,3211.82 v2(1271.75,3243.25) ; U14.4@1279.68,3064.29 v1(1279.68,3100.31) ; v2(1305,775.31) R8.2@1305,831.61 ; v4(1309.02,3610) R29.2@1370.52,3610 ; v4(1310,4060) R25.2@1371.5,4060 ; v2(1410,3105) 1410,3067.53 Y1.2@1413.34,3064.2 ; U6.9@1514.57,2066.14 1538.52,2066.14 1542.38,2070 v1(1545,2070) ; C19.1@1517.13,1710 v1(1545,1710) ; v2(1620,745.31) 1620,810.11 1620.84,810.94 U5.6@1628.66,810.94 ; R19.1@1668.7,1710 v1(1725,1710) ; v4(1800,1935) 1800,1937.5 1815,1952.5 1815,1993.52 C21.1@1813.52,1995 ; R49.2@1950,3840 v4(1995,3840) ; R48.2@1950,4293.5 1965,4278.5 1978.79,4278.5 1987.29,4270 v4(1990,4270) ; R40.1@2035,3470 2058.69,3446.31 2079.9,3446.31 2103.59,3470 v4(2115,3470) ; R39.1@2138.69,3361.31 2159.9,3361.31 2183.59,3385 v4(2200,3385) 2221.31,3363.69 2221.31,3328.44 2223.08,3326.67 2223.08,3305.46 R38.1@2221.31,3303.69 ; 2148.3,3636.55 2172.16,3612.69 2287.69,3497.16 ; v4(2350,4010) R41.2@2350,4060 ; v4(2392.34,3557.34) 2394.26,3555.43 2398.77,3555.43 U9.47@2426.48,3527.71 ; U18.2@2485,3887.72 2485,3845 v4(2495,3835) 2496.91,3833.09 2503.45,3833.09 2520.75,3815.79 C42.2@2520.75,3815 ; v4(2600.42,3157.1) 2600.42,3159.8 2590.5,3169.72 2590.5,3189.21 2607.44,3206.15 U9.63@2607.44,3207.56 ; v4(2660,3025) 2690.78,2994.22 2690.78,2988.85 2691.34,2988.3 2691.34,2979.78 C71.2@2690.78,2979.22 ; C41.2@2699.25,4075 2699.63,4074.63 2699.63,4035.37 v4(2700,4035) ; U9.31@2746.63,3708.66 2773.09,3735.12 2773.09,3740.79 v4(2775,3742.71) ; U9.27@2802.31,3652.99 2803.72,3652.99 2839.34,3688.6 v4(2859.31,3688.6) v4@2862.97,3684.93 ; v4(2920,3100) 2921.91,3098.09 2931.91,3098.09 2937.44,3092.56 2943.35,3092.56 2960,3075.91 Y2.3@2960,3070 ; v4(2925,3210) 2925.18,3210.18 2955.14,3210.18 C70.1@2955.32,3210.35 3004.06,3210.35 Y3.2@3005.22,3209.19 ; U9.15@2927.58,3388.52 2929,3388.52 2954.18,3363.34 2960.55,3363.34 v4(2962.01,3361.87) ; SW4.6@2943.9,4112.83 2946.73,4110 v4(3000,4110) ; C67.2@3005,2860 3005,2959.09 3030,2984.09 Y2.1@3030,2990 3030,2995.91 3047.22,3013.13 C66.1@3110,3013.13 ; C68.1@3015,2920 v4(3050,2920) ; Y3.4@3055.41,3170.81 3059.25,3174.65 C69.1@3130.31,3174.65 3133.09,3171.87 3133.09,3146.91 v4(3135,3145) ; v4(3075,2650) 3075,2716.5 R11.2@3076,2717.5 ; C44.2@3087.13,2585 3087.13,2608.26 3097.5,2618.64 v4(3097.5,2618.74) ; C43.2@3105,2495 3105.76,2494.24 v4(3150,2494.24) ; v4(3110,2980) C66.1@3110,3009.92 C66.1@3110,3013.13 ; v4(3165,4020) C72.1@3165,4062.87 ; C65.2@3170,3013.13 C66.1@3110,3013.13
  Top Layer w11.81: J1R.6@2632.68,1667.6 2657.59,1692.51 v5(2657.59,1754.14)
  Top Layer w15: v2(120,2230) DNP25.2@161.3,2230 ; DNP23.2@151.3,2850 151.3,2818.7 177.51,2792.49 215.14,2792.49 v2(217.63,2790) 221.15,2790 223.65,2787.5 248.13,2787.5 255.63,2780 C2.2@255.63,2775 L2.2@255.63,2700 ; C4.2@325.63,2160 L4.2@325.63,2235 v2(367.63,2235) ; DNP24.2@488.7,2310 489.35,2310.65 489.35,2359.35 v2(490,2360) ; v2(570,2230) DNP21.2@611.3,2230 ; DNP19.2@601.3,2850 601.3,2818.7 630.01,2789.99 671.16,2789.99 v2(673.65,2787.5) 698.13,2787.5 705.63,2780 L1.2@705.63,2775 C1.2@705.63,2700 ; C3.2@775.63,2160 L3.2@775.63,2235 v2(817.63,2235) ; DNP20.2@938.7,2310 939.35,2310.65 939.35,2359.35 v2(940,2360) ; v2(1110,2925) 1113.52,2925 1118.61,2930.09 C29.1@1159.49,2930.09 ; C30.1@1294.68,2924.29 1295.04,2924.65 1334.65,2924.65 v2(1335,2925) ; DNP28.2@1763.22,706.78 v2(1790,680) ; DNP27.2@1833.22,796.78 v2(1860,770)
  Top Layer w15.75: v5(2460.83,1332.56) 2460.83,1336.82 2472.05,1348.04 2472.05,1364.06 2475.2,1367.2 C3C.2@2475.2,1367.99 ; U2C.2@2717.72,1193.39 2719,1192.11 2770.57,1192.11 v5(2771.85,1190.83) 2773.13,1192.11 2806,1192.11 C4C.2@2807.28,1193.39 ; C1C.2@2878.15,1188.27 v5(2878.15,1226.26) ; v5(2915.87,1889.96) 2920.13,1889.96 2926.63,1896.46 C5C.2@2963.11,1896.46 ; v5(3122.77,1430.46) 3147.32,1455 U1C.7@3190.16,1455 ; C10R.2@3544.28,1428.89 3573.93,1458.54 v7(3575,1458.54) 3575,1459.61 3582.87,1467.48 3582.87,1481.57 3586.02,1484.72 C4R.2@3586.81,1484.72 ; v1(3547.44,1849.55) 3548.13,1850.24 3574.31,1850.24 C7R.2@3575,1850.93 ; U2R.4@3669.29,1913.32 3669.39,1913.23 3669.39,1852.34 v5(3669.49,1852.24) ; v5(3749.41,1541.22) 3757.28,1549.09 C3R.2@3782.28,1549.09
  Bottom Layer w10: C38.2@2355,3552.13 2384.42,3552.13 2389.64,3557.34 v4(2392.34,3557.34) ; v4(2600.42,3157.1) 2602.33,3155.18 2602.33,3141.81 2607.87,3136.27 C34.2@2607.87,3135 ; v4(2626.27,3609.68) C26.2@2654.16,3637.57 ; v4(2665.17,3557.33) 2666.25,3557.33 2696.81,3587.89 C27.2@2697.89,3587.89 ; C39.2@2767.13,3780 2767.13,3750.58 v4(2775,3742.71) ; v4(2780,3370) 2810.25,3400.25 C40.2@2815.25,3400.25 ; C25.2@2822.11,3682.11 2822.67,3681.55 2849.55,3681.55 2856.6,3688.6 v4(2859.31,3688.6) ; v4@2855.76,3688.6 v4(2859.31,3688.6) ; C28.2@2894.5,3644.5 2894.5,3653.41 v4(2859.31,3688.6) ; v4(2962.01,3361.87) 2964.71,3361.87 2980.73,3377.89 C35.2@2987.89,3377.89
  Bottom Layer w15.75: C12R.2@3223.23,1612.09 3223.92,1612.78 3223.92,1636.26 v1(3224.61,1636.95) 3224.61,1638.02 3223.23,1639.39 C8R.2@3223.23,1671.25 ; C9R.2@3392.72,1517.6 3395.87,1520.75 3395.87,1546.55 3397.83,1548.52 v1(3397.83,1549.58) ; C6R.2@3414.96,1749.88 3415.14,1750.06 3456.9,1750.06 v7(3457.08,1750.25) ; C13R.2@3484.45,1727.64 3485.24,1727.64 3497.56,1739.96 3497.56,1751.18 v1(3498.31,1751.93) ; v1(3496.26,1608.15) 3497.01,1608.9 3497.01,1615.46 3514.57,1633.01 3515.35,1633.01 3518.5,1636.16 C5R.2@3518.5,1636.95 ; C11R.2@3552.76,1576.65 3585.75,1576.65 3585.75,1571.78 3591.18,1566.34 v1(3591.18,1565.28)
  other v1: 1245,1905 1275,1905 1305,1905 1245,1935 1275,1935 1305,1935 1245,1965 1275,1965 1305,1965 1245,1995 1275,1995 1305,1995 1240.31,3100.31 1240.31,3139.69 1279.68,3139.69
  other v2: 1815,130 2125,130 2730,140 2780,140 2830,140 2890,140 2230,160 2280,160 2780,180 2830,180 2890,180 2230,220 2280,220 2830,220 2890,220 2890,260 2240,280 2280,280 2240,340 2280,340 2040,700 3945,1085 3915,1260 3915,1305 3915,1350 3950,1500 487.88,1545 760.31,3210
  other v3: 600,200 800,200 1000,200 1400,200 2000,200 600,400 200,600 400,600 3000,600 200,800 400,800 200,1000 400,1000 600,1000 800,1000 3000,1000 3200,1000 200,1200 400,1200 600,1200 1000,1200 600,1400 400,1600 600,1600 2200,2000 2400,2000 1000,2200 2200,2200 600,2400 3400,2600 3600,2600 400,2800 3400,2800 3600,2800 1800,3000 3400,3000 3600,3000 3800,3000 3400,3200 3800,3200 600,3400 800,3400 3600,3400 3800,3400 3400,3600 3600,3600 3800,3600 3400,3800 3600,3800 3800,3800 2400,4000 3400,4000 3600,4000 3800,4000 2200,4200 2400,4200 2600,4200 2800,4200 3200,4200 3400,4200 3600,4200 3800,4200 200,4400 1400,4400 1600,4400 2000,4400 2200,4400 2400,4400 2600,4400 2800,4400 3000,4400 3200,4400 3400,4400 3600,4400 3800,4400 600,4600 800,4600 1000,4600 1200,4600 1400,4600 1600,4600 1800,4600 2000,4600 2200,4600 2400,4600 2600,4600 2800,4600 3000,4600 3200,4600 3400,4600 3600,4600 600,4800 800,4800 1000,4800 1200,4800 1400,4800 1600,4800 1800,4800 2000,4800 2200,4800 2400,4800 2600,4800 2800,4800 3000,4800 3200,4800 3400,4800
  other v4: 1820,1575 1855,1575 1385.63,1910.63 1425,1910.63 1464.37,1910.63 1385.63,1950 1425,1950 1464.37,1950 1385.63,1989.37 1425,1989.37 1464.37,1989.37 2231.28,3554.93 2640,3815
  other v5: 3354.53,1608.15 3441.14,1608.15 3441.14,1694.76
"Hydrophone L": J5.3 SB2.2 SB5.2 TP15.TP U7.7 | length 3714
  Top Layer w15: U7.7@856.77,3205 859.17,3207.4 907.72,3207.4 940.31,3240 940.31,3374.69 940,3375 940,3440 SB2.2@930,3450 ; SB5.2@1105,3451.5 SB5.2@1107.5,3451.5 ; J5.3@3742.32,2376.06 2586.44,2376.06 1512.5,3450 1072,3450 ; SB2.2@930,3450 932.5,3450 1072,3450 ; SB2.2@930,3450 1072,3450
"Hydrophone R": SB3.2 SB4.2 TP17.TP U8.7 | length 408.2
  Top Layer w10: SB4.2@390,3451.5 SB3.2@505,3451.5
  Top Layer w15: U8.7@421.77,3205 424.17,3207.4 472.72,3207.4 505.31,3240 SB3.2@505.31,3435.12
INT_RP2CAN: U1C.4 U1R.34 | length 297.2
  Top Layer w7.87: U1C.4@3190.16,1305 3211.15,1305 3374.21,1468.06 U1R.34@3374.21,1513.66
JNTRST: J7.3 U9.57 | length 539.9
  Top Layer w10: J7.3@2483.55,2767.87 2483.55,3250.71 U9.57@2523.92,3291.08
JTCK/SWCLK: J7.9 U9.50 | length 732.2
  Top Layer w10: J7.9@2270.71,2975 2270.71,2910.83 2322.63,2858.92 2360.22,2858.92 2387.16,2885.86 2387.16,3349.2 U9.50@2426.48,3388.52
JTDI: J7.5 U9.51 | length 547.4
  Top Layer w10: J7.5@2412.84,2838.58 2412.84,2960.85 2423.46,2971.47 2423.46,3356.24 2440.4,3373.18 U9.51@2440.4,3374.6
JTDO/TRACESWO: J7.13 U9.56 | length 1161.8
  Top Layer w10: J7.13@2129.29,3116.42 2129.29,3051.56 2083.92,3006.18 2083.92,2956.21 2251.92,2788.2 2299.32,2788.2 2319.36,2808.24 2366.76,2808.24 2386.8,2788.2 2430.93,2788.2 2464.28,2821.55 2464.28,3259.28 U9.56@2510,3305
JTMS/SWDIO: J7.7 U9.49 | length 522.3
  Top Layer w10: J7.7@2342.13,2909.29 2342.13,3332 U9.49@2412.56,3402.44
Leak_Detect: D3.1 Q2.3 U1R.41 | length 3693.9
  Top Layer w8: Q2.3@1681,240 v2(1795,240) ; v2(3445,1205) 3447.29,1202.71 3447.29,1173.59 v2(3590,1030.87) ; U1R.41@3484.45,1516.12 3484.45,1418.91 3514,1389.36 v2(3514,1357) ; v2(3770,680) v2(3770,910)
  Bottom Layer w8: v2(1795,240) 1795,205 1840,160 2193.41,160 2219.28,134.13 2290.72,134.13 2316.59,160 2350,160 2500,310 2890,310 3030,170 3430,170 3510,250 3510,420 v2(3770,680) ; v2(3445,1205) 3514,1274 v2(3514,1357) ; v2(3590,1030.87) 3739.13,1030.87 3770,1000 v2(3770,910)
LEDB_RP2CAN: R8C.1 U1R.18 | length 168.1
  Top Layer w7.87: R8C.1@3188.19,1824.68 3188.19,1748.03 3229.64,1706.57 U1R.18@3262.5,1706.57
LEDB_STM: R47.1 U9.2 | length 159.6
  Top Layer w10: U9.2@2746.63,3207.56 2839.67,3114.53 2839.67,3094.03 R47.1@2845,3088.7
LEDG_RP2CAN: R7C.1 U1R.17 | length 211.6
  Top Layer w7.87: R7C.1@3188.19,1887.68 3188.19,1883.74 3210.83,1861.1 3210.83,1747.66 3236.17,1722.32 U1R.17@3262.5,1722.32
LEDG_STM: R45.1 U9.54 | length 381.5
  Top Layer w10: U9.54@2482.16,3332.84 2483.58,3332.84 2500.52,3349.78 2525.22,3349.78 2695,3180 R45.1@2695,3088.7
LEDR_RP2CAN: R5C.1 U1R.16 | length 255
  Top Layer w7.87: R5C.1@3188.19,1950.67 3188.19,1946.73 3226.57,1908.35 3226.57,1754.19 3242.69,1738.07 U1R.16@3262.5,1738.07
LEDR_STM: R43.1 U9.53 | length 445.7
  Top Layer w10: U9.53@2468.24,3346.76 2469.66,3346.76 2486.6,3363.7 2534.37,3363.7 2770,3128.07 R43.1@2770,3088.7
"Local Oscillator": C33.2 TP13.TP U7.1 U8.1 | length 1440.7
  Top Layer w10: v6(135,3285) 165,3255 U8.1@228.86,3255 ; v6(570,3285) 600,3255 U7.1@663.86,3255 ; TP13.TP@1020,3240 v6(1080,3240) 1148.47,3240 C33.2@1149.67,3241.2 C33.2@1149.67,3246.2
  Bottom Layer w10: v6(135,3285) 135,3315 165,3345 570,3345 575,3345 ; v6(570,3285) 570,3340 575,3345 ; v6(1080,3240) 975,3345 575,3345
MCLK: TP14.TP U14.5 Y1.3 | length 116.3
  Top Layer w10: U14.5@1299.37,3064.29 1340.41,3064.29 1340.5,3064.2 Y1.3@1356.25,3064.2 1365,3072.94 TP14.TP@1365,3120
MISO_RP2CAN: U1C.12 U1R.31 | length 475
  Top Layer w7.87: U1C.12@2975.59,1255 2988.06,1255 3164.44,1431.38 3268.56,1431.38 3326.97,1489.79 U1R.31@3326.97,1516.12
MOSI_RP2CAN: U1C.11 U1R.30 | length 454.6
  Top Layer w7.87: U1C.11@2975.59,1305 2992.32,1305 3090.75,1403.43 3090.75,1437.4 3131.97,1478.62 3293.53,1478.62 3311.22,1496.31 U1R.30@3311.22,1516.12
nCS_RP2CAN: R4C.2 U1C.13 U1R.28 | length 646.2
  Top Layer w7.87: R4C.2@2893.9,1270.55 2897.83,1270.55 2904.72,1263.66 2904.72,1259.13 2958.86,1205 U1C.13@2975.59,1205 2992.32,1205 3059.51,1272.19 3059.51,1289.51 3148.62,1378.62 3245.47,1378.62 v1(3247.03,1377.07) ; U1R.28@3262.5,1549.09 3263.98,1549.09 v1(3263.98,1519.96)
  Bottom Layer w7.87: v1(3247.03,1377.07) 3247.03,1379.36 3263.98,1396.31 v1(3263.98,1519.96)
NetC1_1: C1.1 L1.1 R1.1 U1.3 | length 238.3
  Top Layer w15: R1.1@774.13,2850 774.13,2776.5 L1.1@775.63,2775 C1.1@775.63,2700 U1.3@775.63,2612.28
NetC2_1: C2.1 L2.1 R2.1 U2.3 | length 238.3
  Top Layer w15: R2.1@324.13,2850 324.13,2776.5 C2.1@325.63,2775 L2.1@325.63,2700 U2.3@325.63,2612.28
NetC2C_2: C2C.2 R2C.2 R3C.2 | length 144.3
  Top Layer w7.87: R3C.2@2303.35,1638.66 2303.35,1666.61 2334.06,1697.32 C2C.2@2334.84,1697.32 2335.63,1697.32 2366.34,1666.61 R2C.2@2366.34,1638.66
NetC2R_1: C2R.1 R1R.2 Y1R.3 | length 263.4
  Top Layer w8: C2R.1@2917.52,1626.46 2918.31,1626.46 2934,1610.76 3040.61,1610.76 3074.13,1644.29 Y1R.3@3074.13,1650.2 3080.75,1643.58 R1R.2@3151.85,1643.58
NetC10_1: C10.1 CR1.2 L5.2 Q1.4 Q1.7 U6.13 | length 974.8
  Top Layer w9.84: C10.1@1275,2177.13 L5.2@1275,2235 1277.34,2232.66 1496.66,2232.66 CR1.2@1499,2235 ; Q1.4@1395.59,2358.39 Q1.7@1395.59,2323.74 CR1.2@1587.74,2323.74 ; U6.13@1412.2,2066.14 1412.2,2148.2 CR1.2@1499,2235 ; CR1.2@1690,2400 1664,2400 CR1.2@1587.74,2323.74 ; CR1.2@1499,2235 CR1.2@1587.74,2323.74
NetC10_2: C10.2 U6.15 | length 148.8
  Top Layer w8: C10.2@1275,2142.87 1337.13,2142.87 1361.02,2118.98 U6.15@1361.02,2066.14
NetC11_1: C11.1 C17.1 R19.2 R22.1 U6.8 | length 250.5
  Top Layer w8: U6.8@1514.57,1833.86 1514.57,1838.02 1519.43,1842.87 C17.1@1575,1842.87 1594.25,1842.87 1607.13,1830 C11.1@1632.87,1830 1632.09,1829.21 1632.09,1770.79 R22.1@1631.3,1770 R19.2@1631.3,1710
NetC11_2: C11.2 R21.1 | length 60.7
  Top Layer w8: C11.2@1667.13,1830 1667.91,1830.79 1667.91,1889.21 R21.1@1668.7,1890
NetC12_1: C12.1 R15.2 R16.1 U6.2 | length 221.6
  Top Layer w8: C12.1@1307.13,1650 1307.91,1650.79 1307.91,1709.21 R16.1@1308.7,1710 R15.2@1308.7,1770 1335,1770 1359.3,1794.3 1359.3,1832.13 U6.2@1361.02,1833.86
NetC13_1: C13.1 U6.3 | length 190.7
  Top Layer w8: C13.1@1365,1652.13 1365,1725 1386.61,1746.61 U6.3@1386.61,1833.86
NetC15_1: C15.1 R17.2 U6.4 | length 247.7
  Top Layer w8: U6.4@1412.2,1833.86 1412.2,1752.8 1425,1740 C15.1@1425,1652.13 1425.79,1652.91 1484.21,1652.91 R17.2@1485,1653.7
NetC16_1: C16.1 U6.10 | length 164.6
  Top Layer w8: U6.10@1488.98,2066.14 1488.98,2103.98 1500,2115 1560,2115 1575,2100 C16.1@1575,2070
NetC17_2: C17.2 R21.2 U6.7 | length 177.9
  Top Layer w8: U6.7@1488.98,1833.86 1493.83,1838.72 1493.83,1861.13 1509.83,1877.13 C17.2@1575,1877.13 ; C17.2@1575.79,1877.13 1602.68,1877.13 1613.16,1887.6 1628.9,1887.6 R21.2@1631.3,1890
NetC30_2: C30.2 U14.3 | length 85
  Top Layer w10: U14.3@1260,3064.29 1260,3042.02 1283.59,3018.43 1283.59,3004.29 1293.59,2994.29 C30.2@1294.68,2994.29
NetC32_2: C32.2 U14.1 | length 76.6
  Top Layer w10: C32.2@1146.42,3070.12 1152.26,3064.29 U14.1@1220.63,3064.29
NetC33_1: C33.1 U14.10 | length 65.9
  Top Layer w10: C33.1@1219.67,3241.2 1220.63,3240.24 U14.10@1220.63,3175.71
NetC65_1: C65.1 C66.2 U9.4 Y2.2 | length 497.5
  Top Layer w10: U9.4@2774.47,3235.4 2884.87,3125 2980,3125 2991.65,3113.35 2991.65,3075.86 2997.51,3070 Y2.2@3030,3070 3030,3066.73 3046.65,3050.08 C66.2@3110,3050.08 3111.6,3048.48 3168.4,3048.48 C65.1@3170,3046.87
NetC67_1: C67.1 C68.2 U9.3 Y2.4 | length 448.8
  Top Layer w10: U9.3@2760.55,3221.48 2919.47,3062.56 2919.47,3036.43 2960,2995.91 Y2.4@2960,2990 2971.25,2978.75 C67.1@2971.25,2860
NetC69_2: C69.2 U9.6 Y3.1 | length 372.4
  Top Layer w10: U9.6@2817.13,3249.84 2803.72,3263.24 U9.6@2802.31,3263.24 2830.39,3235.16 3027.48,3235.16 3057.28,3205.35 C69.2@3130.31,3205.35
NetC70_2: C70.2 U9.5 Y3.3 | length 248.8
  Top Layer w10: U9.5@2789.8,3249.32 2789.8,3247.91 2858.07,3179.65 C70.2@2955.32,3179.65 2996.38,3179.65 Y3.3@3005.22,3170.81
NetC72_2: C72.2 R44.2 R46.2 | length 204.7
  Top Layer w10: R44.2@3065,4060 3098.96,4060 3136.08,4097.13 ; R46.2@3068.7,4150 3074.16,4144.54 3088.67,4144.54 3136.08,4097.13 ; C72.2@3165,4097.13 3136.08,4097.13
NetCR1_1: CR1.1 CR1.3 R18.1 U6.12 | length 989.4
  Top Layer w8: U6.12@1437.8,2066.14 1437.8,2084.84 1445.53,2092.57 1445.53,2096.29 1475.78,2126.54 1578.22,2126.54 1631.06,2073.7 R18.1@1635,2073.7 1824.43,2073.7 1972,2221.27 1972,2283.5 1988.5,2300 CR1.1@2037,2300 CR1.3@2037,2500
NetD1C_1: D1C.1 R5C.2 | length 78.2
  Top Layer w7.87: D1C.1@3081.22,1929.93 3107.78,1929.93 3128.52,1950.67 R5C.2@3150.79,1950.67
NetD1C_2: D1C.2 R7C.2 | length 73.7
  Top Layer w7.87: D1C.2@3081.22,1894.49 3117.32,1894.49 3125.75,1886.07 3149.18,1886.07 R7C.2@3150.79,1887.68
NetD1C_3: D1C.3 R8C.2 | length 163.8
  Top Layer w8: D1C.3@3018.23,1894.49 3041.92,1894.49 3077.41,1859 3120.41,1859 3150.79,1828.62 R8C.2@3150.79,1824.68
NetD3_2: D3.2 R33.1 | length 80.6
  Top Layer w8: D3.2@1750,160 1750,81.5 R33.1@1751.5,80
NetD4_1: D4.1 R34.2 | length 102.7
  Top Layer w8: D4.1@2070,125 2076.5,131.5 R34.2@2076.5,225
NetD5_1: D5.1 R35.2 | length 283.4
  Top Layer w8: D5.1@1950,140 1950,200 2063.25,313.25 R35.2@2126.5,313.25
NetD6_2: D6.2 R36.1 | length 76.5
  Top Layer w11: D6.2@875,4530 R36.1@951.5,4530
NetD7_1: D7.1 R43.2 | length 121.7
  Top Layer w10: R43.2@2770,3051.3 2773.94,3051.3 2838.68,2986.55 2838.68,2973.54 2844.51,2967.72 D7.1@2849.43,2967.72
NetD7_2: D7.2 R45.2 | length 214.5
  Top Layer w10: R45.2@2695,3051.3 2730.27,3051.3 2764.68,3016.89 2777.98,3016.89 2812.19,2982.69 2812.19,2964.24 2838.32,2938.11 2843.6,2938.11 D7.2@2849.43,2932.28
NetD7_3: D7.3 R47.2 | length 246.3
  Top Layer w10: D7.3@2786.44,2932.28 2791.36,2932.28 2812.19,2911.46 2869.32,2911.46 2875.18,2917.31 2875.18,2982.69 2845,3012.86 R47.2@2845,3051.3
NetD8_2: D8.2 R37.1 | length 81.4
  Top Layer w11: D8.2@2090,660 2090,736.5 R37.1@2093.5,740
NetD9_2: D9.2 R50.1 | length 81.5
  Top Layer w11: D9.2@550,4530 R50.1@631.5,4530
NetDNP0_1: DNP0.1 U1R.4 | length 383.2
  Top Layer w8: U1R.4@3452.95,1786.79 3452.95,1894.22 3525,1966.27 3525,2022.02 3573.7,2070.72 DNP0.1@3573.7,2120
NetDNP0_2: DNP0.2 U1R.5 | length 374.3
  Top Layer w8: U1R.5@3437.2,1786.79 3437.2,1905.05 3470.31,1938.15 3470.31,1983.65 3536.3,2049.64 DNP0.2@3536.3,2120
NetDNP1_1: DNP1.1 U1R.2 | length 278.6
  Top Layer w8: U1R.2@3484.45,1786.79 3484.45,1888.13 3549.46,1953.15 3558.15,1953.15 3593.7,1988.7 DNP1.1@3593.7,2015
NetDNP1_2: DNP1.2 U1R.3 | length 264.5
  Top Layer w8: U1R.3@3468.7,1786.79 3468.7,1888.71 3556.3,1976.31 DNP1.2@3556.3,2015
NetDNP2_1: DNP2.1 U1R.7 | length 198.9
  Top Layer w8: U1R.7@3405.71,1786.79 3405.71,1945.94 3431.06,1971.3 DNP2.1@3435,1971.3
NetDNP2_2: DNP2.2 U1R.6 | length 250.7
  Top Layer w8: U1R.6@3421.46,1786.79 3421.46,1921.46 3451.47,1951.47 3453.49,1951.47 3458.76,1956.74 3458.76,1988.87 3438.94,2008.7 DNP2.2@3435,2008.7
NetDNP7_1: DNP7.1 U9.43 | length 305.1
  Top Layer w10: DNP7.1@2295,3808.7 2298.94,3808.7 2345.55,3762.09 2345.55,3720 U9.43@2482.16,3583.39